# Altium PCB machdaucam.PcbDoc
Units mm, origin at the board's own origin, x right, y up, seen from the top; angles counter-clockwise.
Board outline 78 x 30 mm, 2 copper layers (Top Layer, Bottom Layer); 2 components, 14 nets, 66 pads, 0 vias.
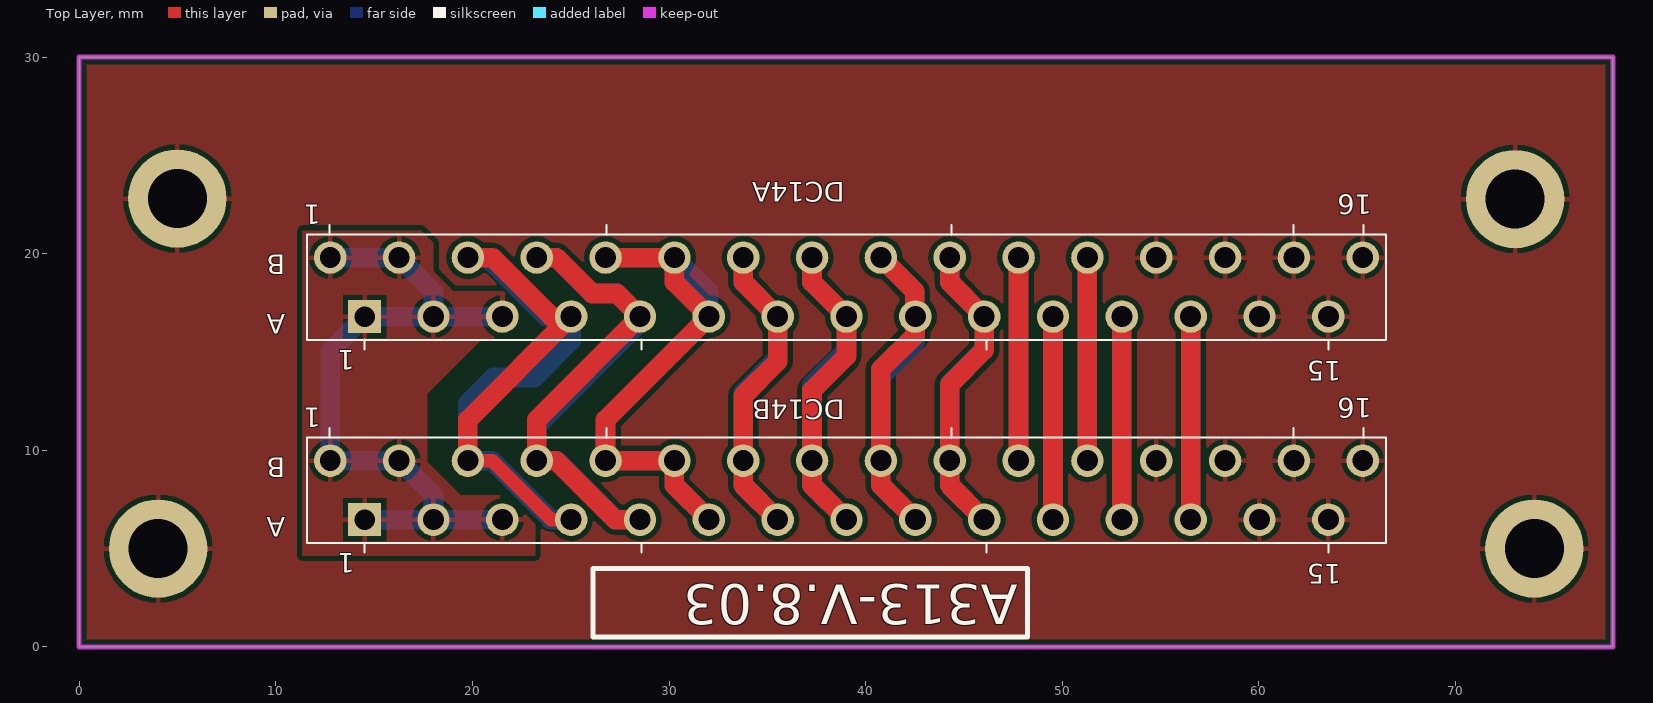
[diagram p0: Top Layer view]
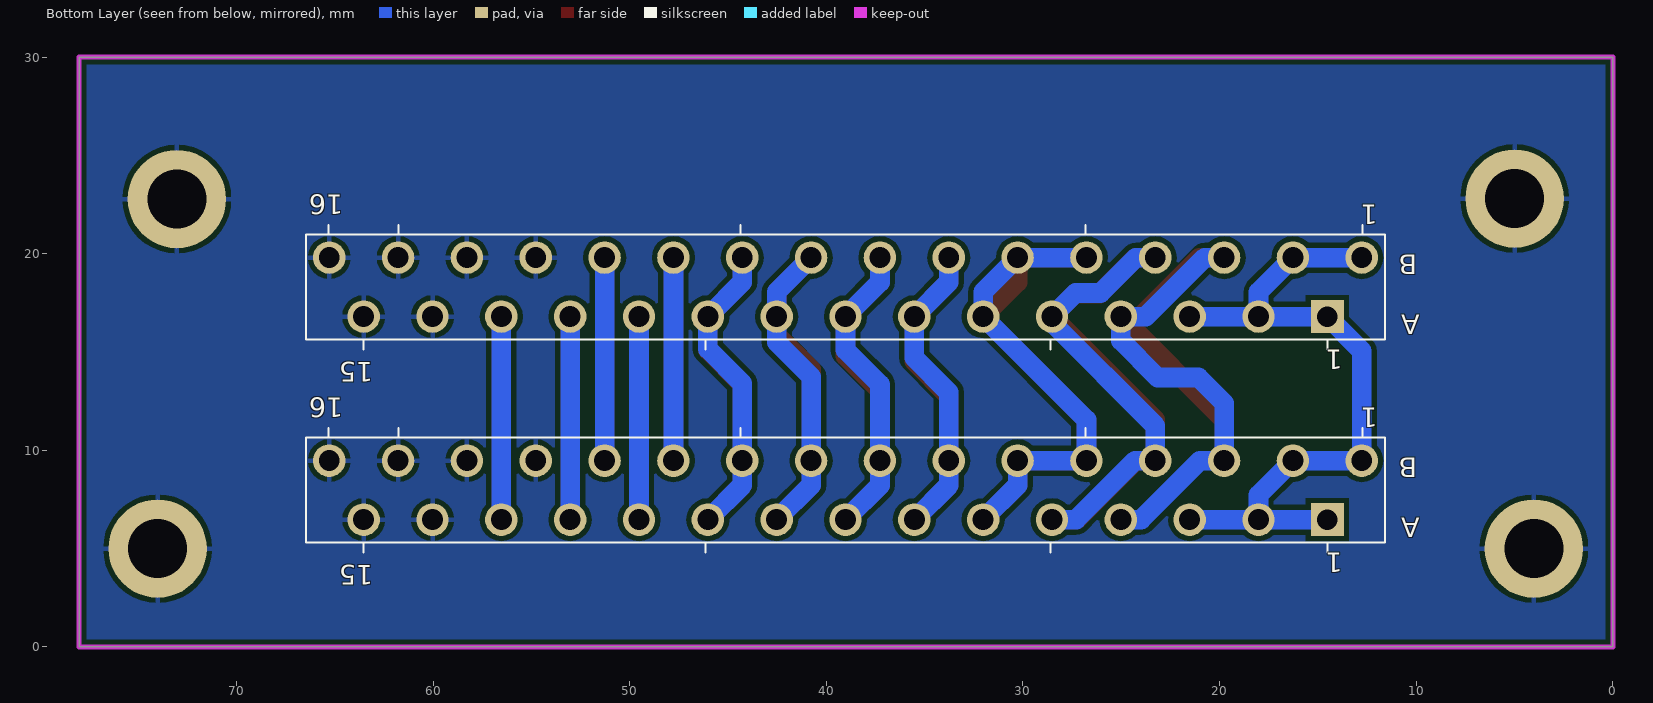
[diagram p1: Bottom Layer view, seen from below]

## Layer stack, top to bottom
Top Solder: solder mask 0.0102, Solder Resist, Dk 3.5
Top Layer: signal copper 0.0356
Dielectric1: dielectric 0.32, FR-4, Dk 4.8
Bottom Layer: signal copper 0.0356
Bottom Solder: solder mask 0.0102, Solder Resist, Dk 3.5

## Board outline
0,0 0,30 78,30 78,0

## Design rules (kind name [scope] priority, off if disabled: settings)
Clearance [All] p1: gap=0.254 ignorepadtopadclearanceinfootprint=FALSE except(0: Arc-Hole Track-Hole SMDPad-Hole THPad-Hole Via-Hole Fill-Hole Poly-Hole Region-Hole Text-Hole)
HoleSize [All] p1: absolutevalues=TRUE maxlimit=5 minlimit=0.025 maxpercent=80.000 minpercent=20.000
PolygonConnect [All] p1: connectstyle=Relief reliefconductorwidth=0.254 reliefentries=4 polygonreliefangle="90 Angle" airgapwidth=0.254
RoutingVias [All] p1: holewidth=0.711 width=1.27 viastyle="Through Hole" minholewidth=0.711 minwidth=1.27 maxholewidth=0.711 maxwidth=1.27
SilkToSolderMaskClearance SilkscreenOverComponentPads [IsPad] p1: minsilkscreentomaskgap=0.254 clearancetoexposedcopper=TRUE
SolderMaskExpansion [All] p1: expansion=0.102
Width [All] p1: maxlimit=1 minlimit=0.5 preferedwidth=0.5
28 further rules are at their usual default settings.

## Classes and differential pairs
component class DAUCAM: A313-V.8.03

## Components (designator, comment, footprint, x,y, rotation, side; value= is the part's Value field where it differs from the comment)
A313-V.8.03 "CON31" DAU_CAM_31_CHAN_NGA 66.203,15.76 r90 top locked (schematic designator DC31c)
DC1 "CON31" dau_cam_31_chan_Nga 66.203,5.435 r90 top

## Footprints (in the part's own frame and the unit in brackets; to place one, negate y for a bottom-side part, rotate by r counter-clockwise, add the part's x,y. Pads: shape width x height; smd on the part's side, far side on the other; paste and mask are expansions set on the pad)
DAU_CAM_31_CHAN_NGA [mil]
  rect 66x66 hole 41: 1(40.94,2034.57)
  round 65 hole 42: 2(159.06,2103.46) 3(40.94,1896.77) 4(159.06,1965.67) 5(40.94,1758.98) 6(159.06,1827.87) 7(40.94,1621.18) 8(159.06,1690.08) 9(40.94,1483.39) 10(159.06,1552.28) 11(40.94,1345.59) 12(159.06,1414.49) 13(40.94,1207.8) 14(159.06,1276.69) 15(40.94,1070) 16(159.06,1138.9) 17(40.94,932.2) 18(159.06,1001.1) 19(40.94,794.41) 20(159.06,863.31) 21(40.94,656.61) 22(159.06,725.51) 23(40.94,518.82) 24(159.06,587.72) 25(40.94,381.02) 26(159.06,449.92) 27(40.94,243.23) 28(159.06,312.13) 29(40.94,105.43) 30(159.06,174.33) 31(159.06,36.54)
  silkscreen extent -25,-10 224,2150
dau_cam_31_chan_Nga [mil]
  rect 66x66 hole 41: 1(40.94,2034.57)
  round 65 hole 42: 2(159.06,2103.46) 3(40.94,1896.77) 4(159.06,1965.67) 5(40.94,1758.98) 6(159.06,1827.87) 7(40.94,1621.18) 8(159.06,1690.08) 9(40.94,1483.39) 10(159.06,1552.28) 11(40.94,1345.59) 12(159.06,1414.49) 13(40.94,1207.8) 14(159.06,1276.69) 15(40.94,1070) 16(159.06,1138.9) 17(40.94,932.2) 18(159.06,1001.1) 19(40.94,794.41) 20(159.06,863.31) 21(40.94,656.61) 22(159.06,725.51) 23(40.94,518.82) 24(159.06,587.72) 25(40.94,381.02) 26(159.06,449.92) 27(40.94,243.23) 28(159.06,312.13) 29(40.94,105.43) 30(159.06,174.33) 31(159.06,36.54)
  silkscreen extent -25,-10 224,2150

## Free pads (board coordinates)
  round 5 hole 3: 1(4.025,5) 1(5,22.8) 1(73.025,22.775) 1(74,5)

## Nets (pads, with @x,y where several pads share a name; then routed paths per layer and width w, separated by ;. In a path a pad name is that pad's centre, name@x,y a point inside that pad or via, vN(x,y) a via of type N, cw(c..) or ccw(c..) an arc to the next point about the centre after c; other vN are vias at no path point)
22: A313-V.8.03.22 DC1.22 | length 20.7
  Top Layer w1: DC1.22 47.775,19.775 47.8,19.8 A313-V.8.03.22
  Bottom Layer w1: DC1.22 A313-V.8.03.22
23: A313-V.8.03.23 DC1.23 | length 20.6
  Top Layer w1: DC1.23 A313-V.8.03.23
  Bottom Layer w1: DC1.23 A313-V.8.03.23
24: A313-V.8.03.24 DC1.24 | length 20.6
  Top Layer w1: DC1.24 A313-V.8.03.24
  Bottom Layer w1: DC1.24 A313-V.8.03.24
25: A313-V.8.03.25 DC1.25 | length 20.6
  Top Layer w1: DC1.25 A313-V.8.03.25
  Bottom Layer w1: DC1.25 A313-V.8.03.25
+3.5V: A313-V.8.03.13 A313-V.8.03.14 DC1.13 DC1.14 | length 31
  Top Layer w1: A313-V.8.03.14 33.775,18.55 A313-V.8.03.13 35.525,14.525 33.775,12.775 DC1.14 33.775,8.225 DC1.13
  Bottom Layer w1: A313-V.8.03.14 33.775,18.55 A313-V.8.03.13 35.525,14.7 33.775,12.95 DC1.14 33.775,8.225 DC1.13
+5V: A313-V.8.03.1 A313-V.8.03.2 A313-V.8.03.3 A313-V.8.03.4 A313-V.8.03.5 DC1.1 DC1.2 DC1.3 DC1.4 DC1.5 | length 36.5
  Bottom Layer w1: A313-V.8.03.2 A313-V.8.03.4 18.025,18.05 A313-V.8.03.3 ; DC1.1 DC1.3 ; DC1.5 DC1.3 ; A313-V.8.03.5 A313-V.8.03.3 ; DC1.3 18.025,7.725 DC1.4 DC1.2 12.775,15.05 A313-V.8.03.1 A313-V.8.03.3
+6.3V: A313-V.8.03.6 A313-V.8.03.7 DC1.6 DC1.7 | length 46.2
  Top Layer w0.7: DC1.6 21,9.475 24,6.475 DC1.7
  Top Layer w1: DC1.6 19.775,11.55 A313-V.8.03.7 24.025,16.8 21.025,19.8 A313-V.8.03.6
  Bottom Layer w1: A313-V.8.03.6 20.759,19.8 23.759,16.8 A313-V.8.03.7 25.025,15.575 23.15,13.7 21.075,13.7 19.775,12.4 DC1.6 21,9.475 24,6.475 DC1.7
+12.6V: A313-V.8.03.8 A313-V.8.03.9 DC1.8 DC1.9 | length 45
  Top Layer w1: A313-V.8.03.8 24.275,19.8 26.1,17.975 27.35,17.975 A313-V.8.03.9 23.275,11.55 DC1.8 24.259,9.475 27.259,6.475 DC1.9
  Bottom Layer w1: A313-V.8.03.8 24.259,19.8 26.059,18 27.325,18 A313-V.8.03.9 28.525,16.5 23.275,11.25 DC1.8 24.3,9.475 27.3,6.475 DC1.9
+27V: A313-V.8.03.10 A313-V.8.03.11 A313-V.8.03.12 DC1.10 DC1.11 DC1.12 | length 47.9
  Top Layer w1: A313-V.8.03.10 A313-V.8.03.12 30.275,18.55 A313-V.8.03.11 26.775,11.55 DC1.10 DC1.12 30.275,8.225 DC1.11
  Bottom Layer w1: A313-V.8.03.10 A313-V.8.03.12 32.025,18.05 A313-V.8.03.11 26.775,11.55 DC1.10 DC1.12 30.275,8.225 DC1.11
-5V: A313-V.8.03.21 DC1.21 | length 20.6
  Top Layer w1: DC1.21 A313-V.8.03.21
  Bottom Layer w1: DC1.21 A313-V.8.03.21
-6.3V: A313-V.8.03.17 A313-V.8.03.18 DC1.17 DC1.18 | length 31
  Top Layer w1: A313-V.8.03.18 42.5,18.075 42.5,16.825 A313-V.8.03.17 42.525,15.875 40.775,14.125 DC1.18 40.775,8.225 DC1.17
  Bottom Layer w1: A313-V.8.03.18 42.525,18.05 A313-V.8.03.17 42.525,15.5 40.775,13.75 DC1.18 40.775,8.225 DC1.17
-12.6V: A313-V.8.03.15 A313-V.8.03.16 DC1.15 DC1.16 | length 31
  Top Layer w1: A313-V.8.03.16 37.275,18.55 A313-V.8.03.15 39.025,14.8 37.275,13.05 DC1.16 37.275,8.225 DC1.15
  Bottom Layer w1: A313-V.8.03.16 37.275,18.55 A313-V.8.03.15 39.025,15.1 37.275,13.35 DC1.16 37.275,8.225 DC1.15
-23V: A313-V.8.03.19 A313-V.8.03.20 DC1.19 DC1.20 | length 31
  Top Layer w1: A313-V.8.03.20 44.275,18.55 A313-V.8.03.19 46.025,15.1 44.275,13.35 DC1.20 44.275,8.225 DC1.19
  Bottom Layer w1: A313-V.8.03.20 44.275,18.55 A313-V.8.03.19 46.025,15.15 44.275,13.4 DC1.20 44.275,8.225 DC1.19
GND: A313-V.8.03.26 A313-V.8.03.27 A313-V.8.03.28 A313-V.8.03.29 A313-V.8.03.30 A313-V.8.03.31 DC1.26 DC1.27 DC1.28 DC1.29 DC1.30 DC1.31 pad.1

## Polygon pours and split planes (outlines as drawn)
GND on Top Layer "Top Layer-No Net" (solid, remove dead copper, pour order 11): 0,0 0,30 78,30 78,0
+5V on Top Layer "Top Layer-+5V" (solid, pour order 9): 11.375,21.175 17.4,21.175 18.025,20.55 18.025,19.1 19.025,18.1 21.6,18.1 22.725,16.975 22.725,15.675 20.5,15.675 17.7,12.875 17.7,9.425 19.4,7.725 21.475,7.725 21.625,7.575 21.875,7.575 23.2,6.25 23.2,4.65 11.35,4.65 11.35,5.175 11.35,21.15
GND on Bottom Layer "Top Layer-No Net1" (solid, remove dead copper, pour order 12): 0,0 0,30 78,30 78,0

## Keep-outs
Keep-Out Layer:
  the board outline again, w0.254

## Silkscreen, mask and mechanical layers (free items; w line width, h text height)
Top Overlay:
  lines w0.254: 26.125,0.5 48.225,0.5 48.225,4 26.125,4 26.125,0.5
  text "DC14A" at 38.925,23.625 h1 r180
  text "DC14B" at 38.925,12.575 h1 r180
Mechanical 1:
  circle w0.013: c4.011,4.996 r1.5
  circle w0.013: c73.011,22.796 r1.5
  circle w0.013: c5.011,22.796 r1.5
  circle w0.013: c74.011,4.996 r1.5
  circle w0.013: c12.761,19.796 r0.4
  circle w0.013: c16.261,19.796 r0.4
  circle w0.013: c19.761,19.796 r0.4
  circle w0.013: c23.261,19.796 r0.4
  circle w0.013: c26.761,19.796 r0.4
  circle w0.013: c30.261,19.796 r0.4
  circle w0.013: c33.761,19.796 r0.4
  circle w0.013: c37.261,19.796 r0.4
  circle w0.013: c40.761,19.796 r0.4
  circle w0.013: c44.261,19.796 r0.4
  circle w0.013: c51.261,19.796 r0.4
  circle w0.013: c54.761,19.796 r0.4
  circle w0.013: c58.261,19.796 r0.4
  circle w0.013: c61.761,19.796 r0.4
  circle w0.013: c65.261,19.796 r0.4
  circle w0.013: c14.511,16.796 r0.4
  circle w0.013: c18.011,16.796 r0.4
  circle w0.013: c21.511,16.796 r0.4
  circle w0.013: c25.011,16.796 r0.4
  circle w0.013: c28.511,16.796 r0.4
  circle w0.013: c32.011,16.796 r0.4
  circle w0.013: c35.511,16.796 r0.4
  circle w0.013: c39.011,16.796 r0.4
  circle w0.013: c42.511,16.796 r0.4
  circle w0.013: c46.011,16.796 r0.4
  circle w0.013: c49.511,16.796 r0.4
  circle w0.013: c53.011,16.796 r0.4
  circle w0.013: c56.511,16.796 r0.4
  circle w0.013: c60.011,16.796 r0.4
  circle w0.013: c63.511,16.796 r0.4
  circle w0.013: c47.761,19.796 r0.4
  lines w0.013: 0.011,-0.004 78.011,-0.004 78.011,29.996 0.011,29.996 0.011,-0.004

## Text inside footprints (layer, text, board x,y; h text height)
A313-V.8.03: Top Overlay "B" at 10.488,19.94 h1 r180; Top Overlay "A" at 10.488,16.927 h1 r180; Top Overlay "1" at 12.28,22.478 h1 r180; Top Overlay "1" at 14.03,15.095 h1 r180; Top Overlay "15" at 64.188,14.535 h1 r180; Top Overlay "16" at 65.738,22.986 h1 r180; Bottom Overlay "A" at 9.815,16.903 h1 r180; Bottom Overlay "B" at 9.942,19.951 h1 r180; Bottom Overlay "1" at 13.752,15.125 h1 r180; Bottom Overlay "1" at 11.974,22.491 h1 r180; Bottom Overlay "15" at 63.028,14.49 h1 r180; Bottom Overlay "16" at 64.552,22.999 h1 r180
DC1: Top Overlay "16" at 65.738,12.661 h1 r180; Top Overlay "15" at 64.188,4.21 h1 r180; Top Overlay "1" at 14.03,4.77 h1 r180; Top Overlay "1" at 12.28,12.153 h1 r180; Top Overlay "A" at 10.488,6.602 h1 r180; Top Overlay "B" at 10.488,9.615 h1 r180; Bottom Overlay "16" at 64.552,12.674 h1 r180; Bottom Overlay "15" at 63.028,4.165 h1 r180; Bottom Overlay "1" at 11.974,12.166 h1 r180; Bottom Overlay "1" at 13.752,4.8 h1 r180; Bottom Overlay "B" at 9.942,9.626 h1 r180; Bottom Overlay "A" at 9.815,6.578 h1 r180